# Altium PCB PCB2.PcbDoc (part 1 of 3)
Units mm, origin at the board's own origin, x right, y up, seen from the top; angles counter-clockwise.
Board outline 30 x 45 mm, 4 copper layers (L1 (SIG), L2 (GND), L3 (GND), L4 (SIG+PWR)), stack 0.602 mm thick; 68 components, 50 nets, 259 pads, 113 vias.
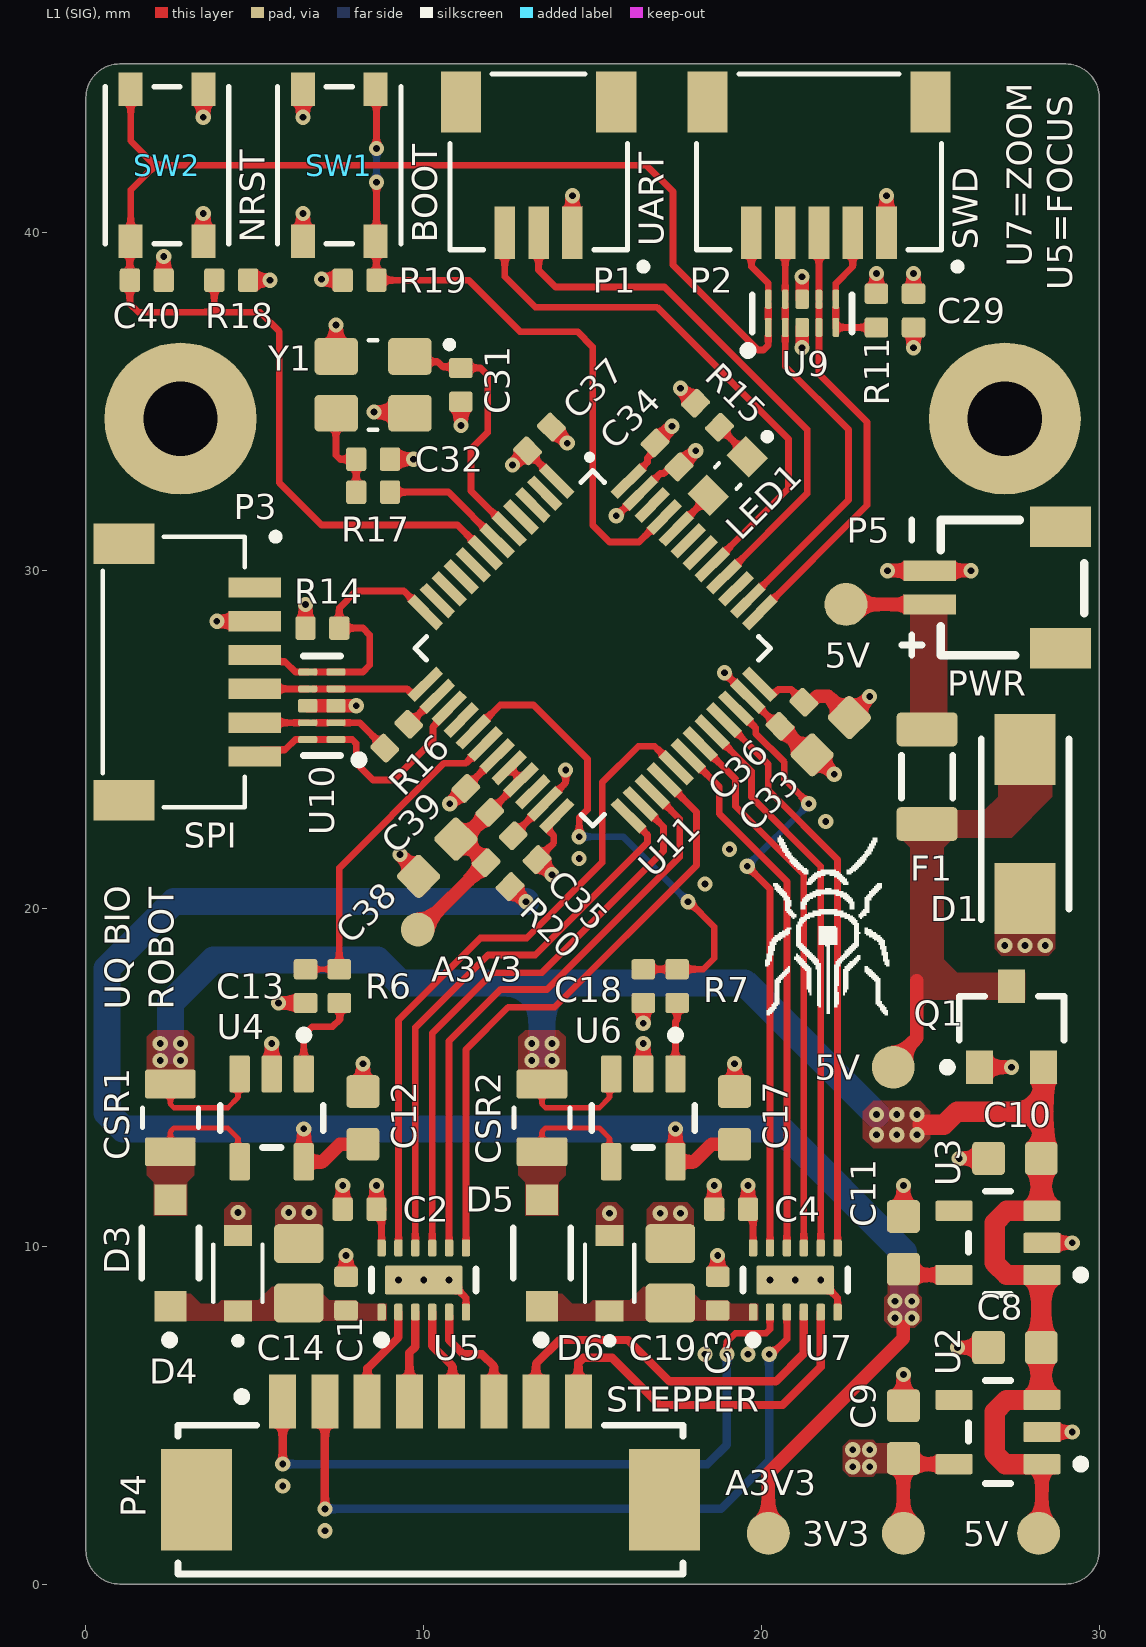
[diagram p0: L1 (SIG) view]
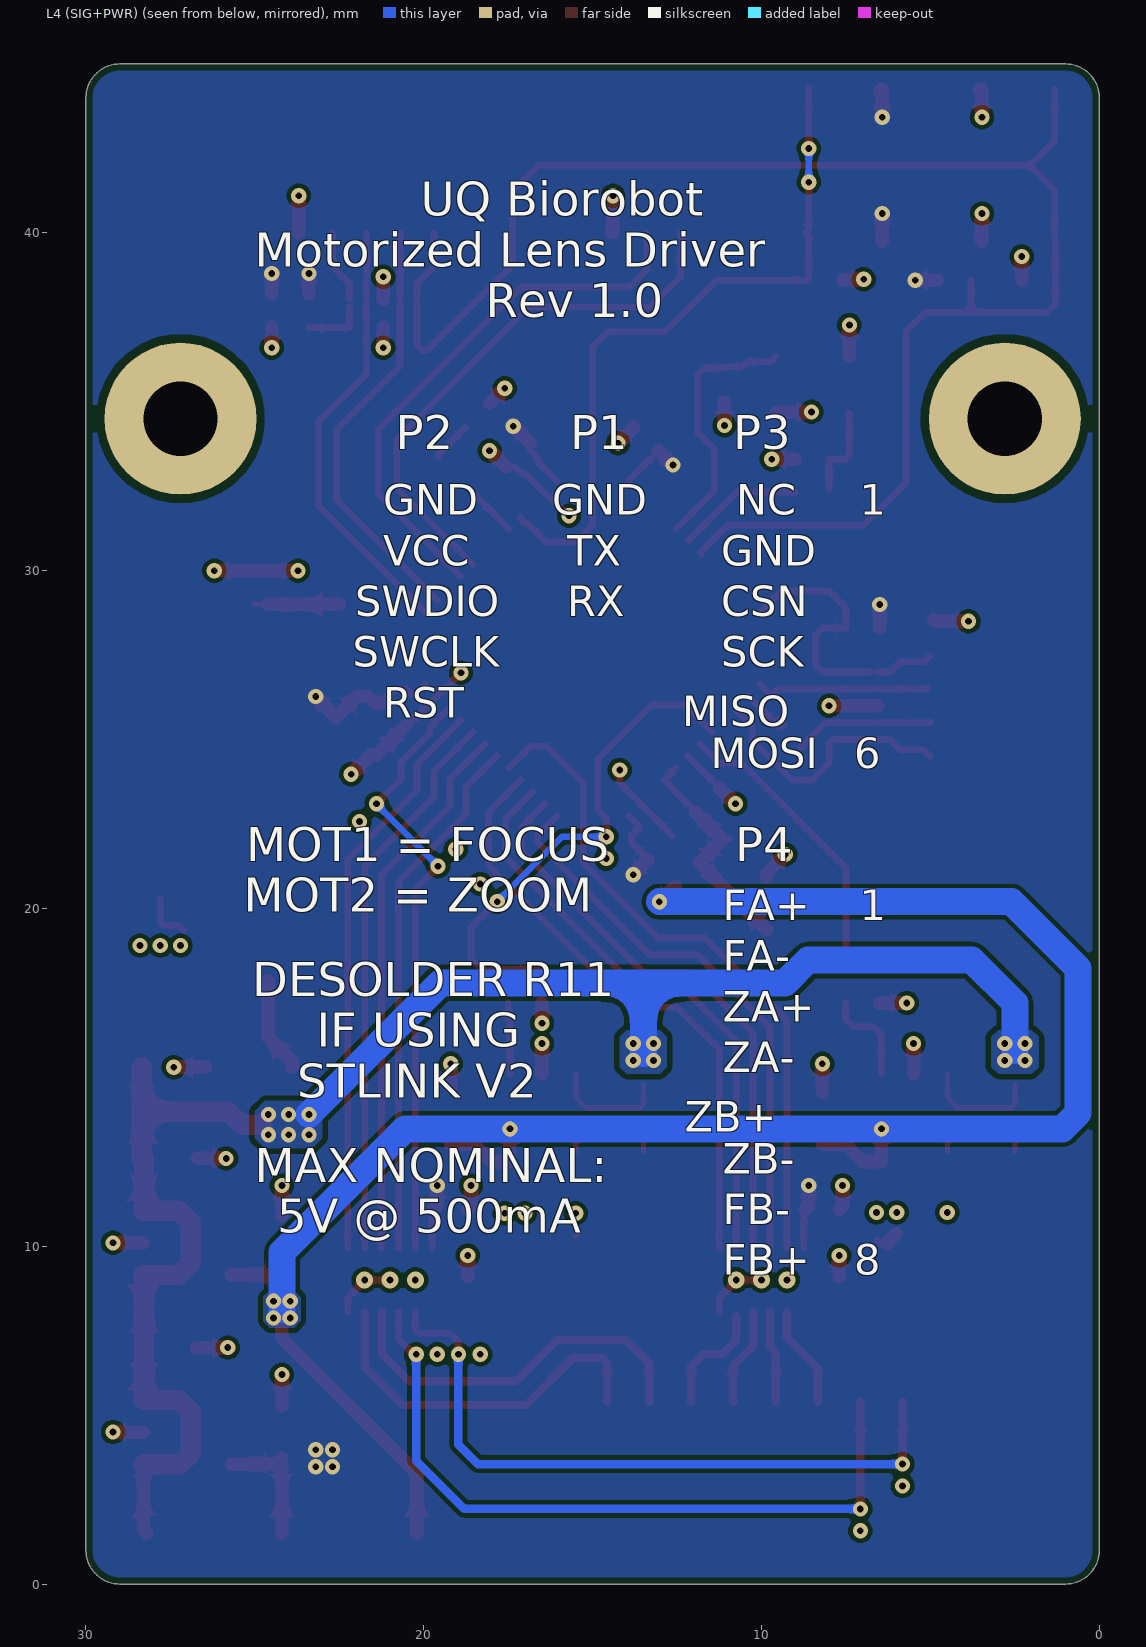
[diagram p1: L4 (SIG+PWR) view, seen from below]
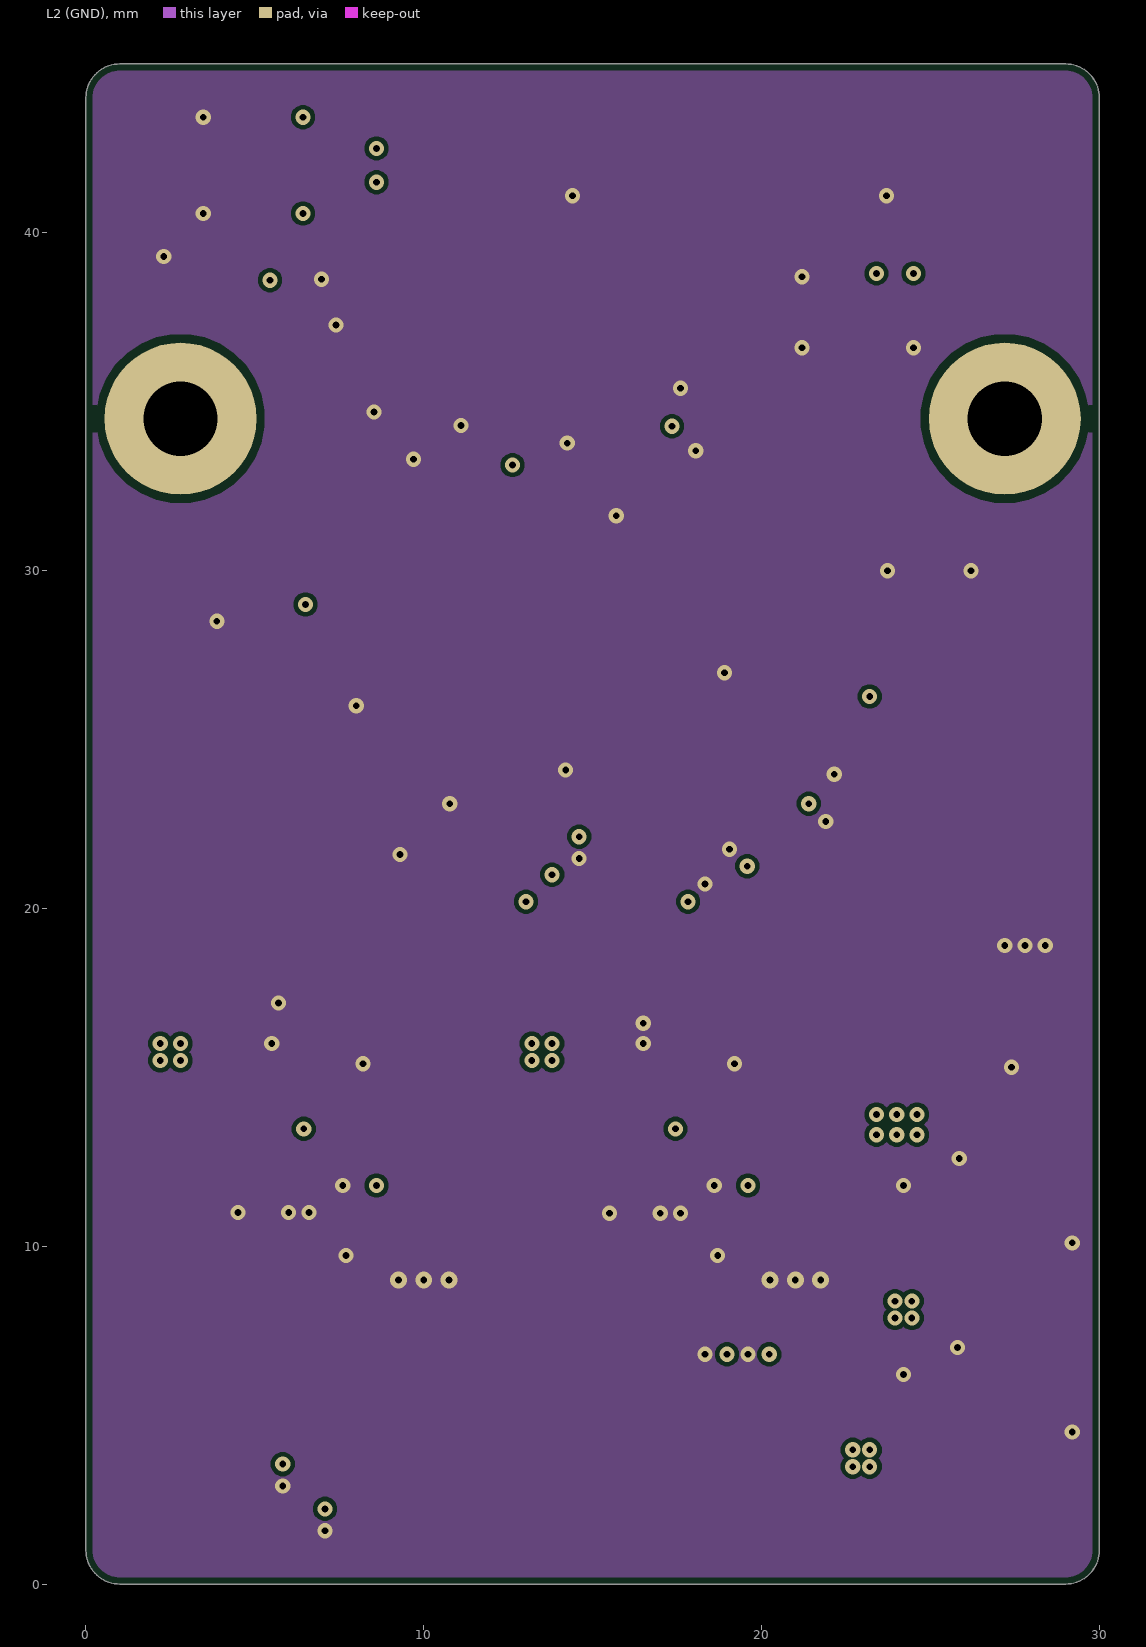
[diagram p2: L2 (GND)]
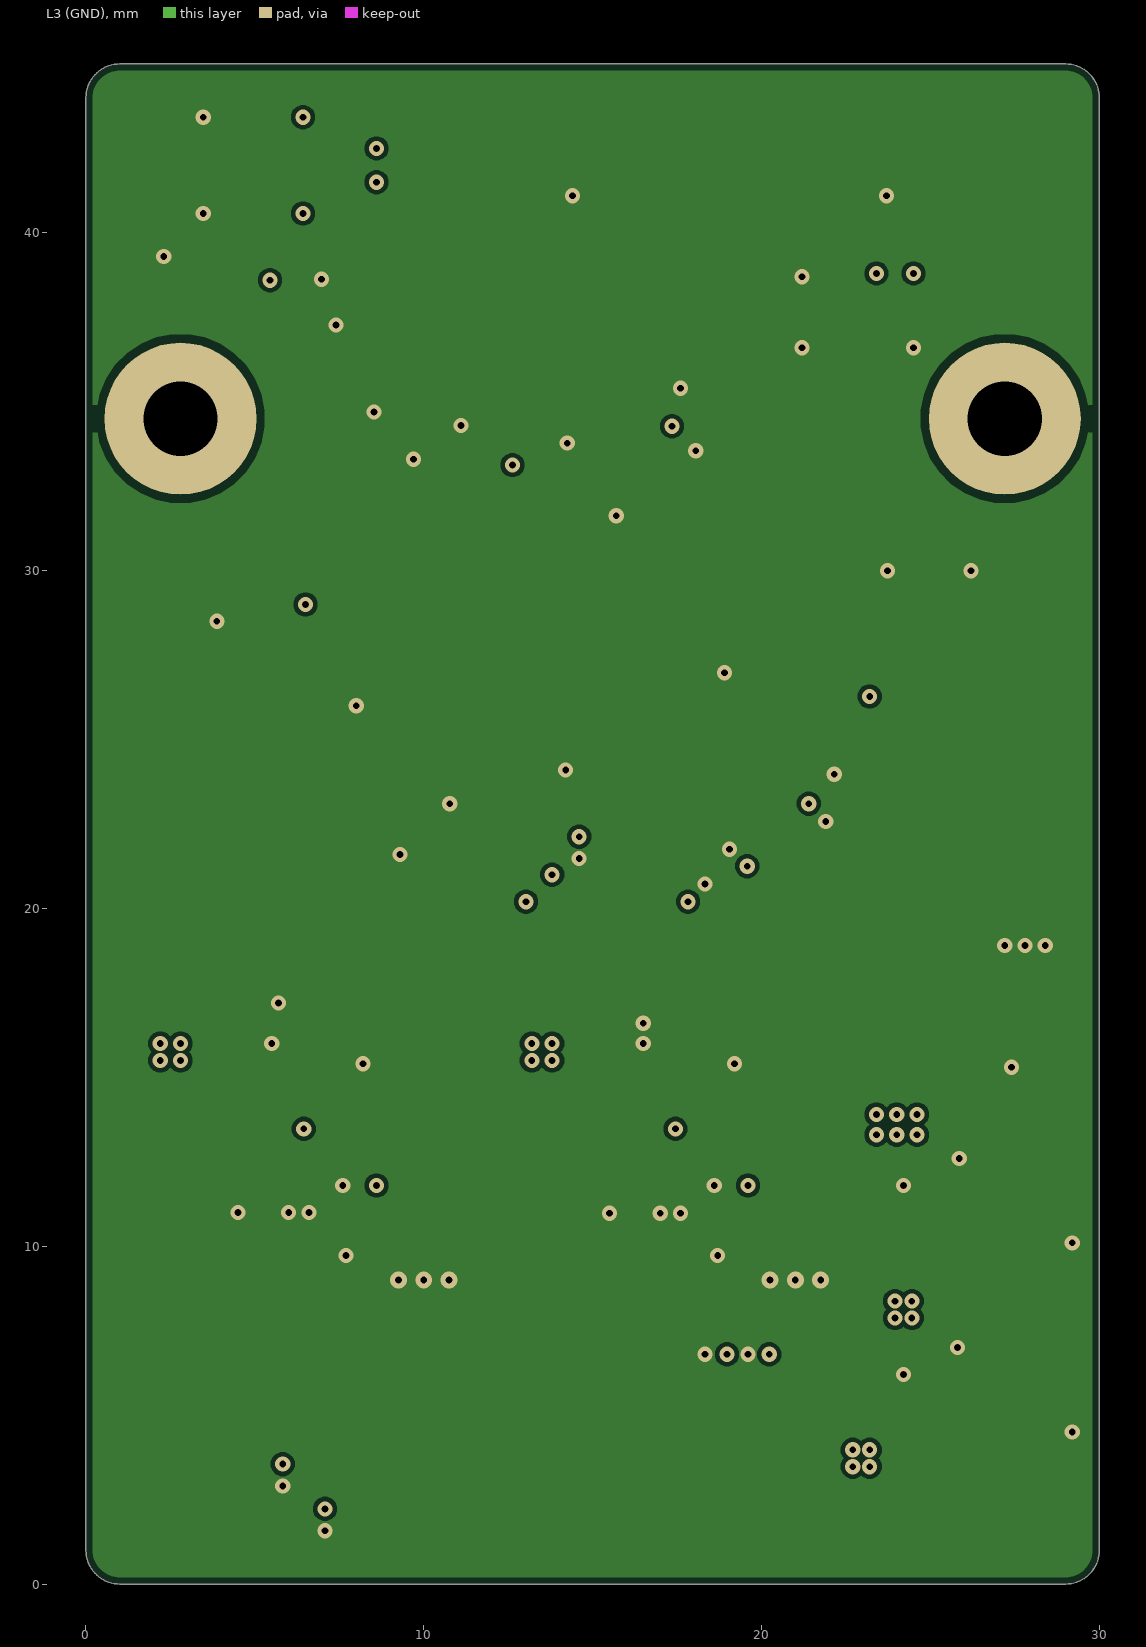
[diagram p3: L3 (GND)]
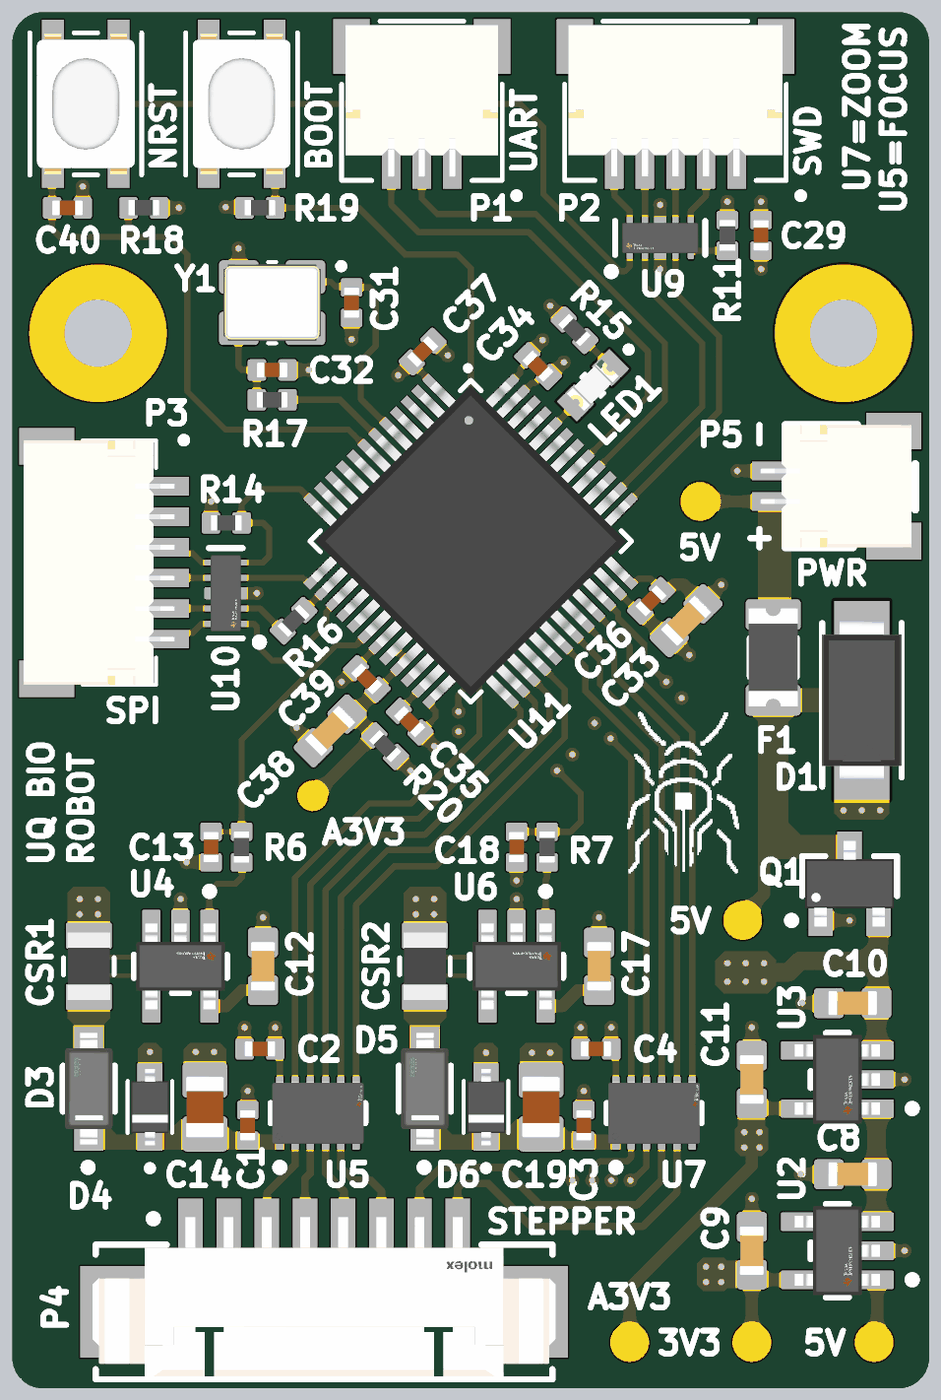
[diagram p4: 3D render of the assembled board from above, using the file's embedded part models]

## Layer stack, top to bottom
Top Solder: solder mask 0.0102, Solder Resist, Dk 3.5
L1 (SIG): signal copper 0.035
Dielectric 2: prepreg 0.0711, PP-006, Dk 4.1
L2 (GND): signal copper 0.035
Dielectric 1: dielectric 0.32, FR-4, Dk 4.8
L3 (GND): signal copper 0.035
Dielectric 3: prepreg 0.0711, PP-006, Dk 4.1
L4 (SIG+PWR): signal copper 0.035
Bottom Solder: solder mask 0.0102, Solder Resist, Dk 3.5

## Board outline
0,44 cw(c1,44) 1,45 29,45 cw(c29,44) 30,44 30,1 cw(c29,1) 29,0 1,0 cw(c1,1) 0,1

## Design rules (kind name [scope] priority, off if disabled: settings)
BoardOutlineClearance [All] p1: gap=0.2 ignorepadtopadclearanceinfootprint=FALSE
Clearance [All] p1: gap=0.127 ignorepadtopadclearanceinfootprint=FALSE except(0.102: Arc-Text Track-Text SMDPad-Text THPad-Text Fill-Text Poly-Text Region-Text Text-Text; 0.12: Arc-Arc Arc-Track Track-Track; 0.15: Arc-SMDPad Arc-Via Track-SMDPad Track-Via SMDPad-SMDPad SMDPad-THPad THPad-THPad Fill-Fill Fill-Poly Fill-Region Poly-Poly Poly-Region Region-Region; 0.2: Arc-THPad Track-THPad; 0.25: Arc-Hole Track-Hole SMDPad-Hole THPad-Fill THPad-Poly THPad-Region THPad-Hole Via-Hole Fill-Hole Poly-Hole Region-Hole Text-Hole)
DiffPairsRouting [InDifferentialPairClass('USBCONN_DIFF')] p1: maxlimit=0.127 minlimit=0.102 mostfreqgap=0.127 toplayer_mingap=0.127 toplayer_minwidth=0.2 toplayer_maxwidth=0.2 toplayer_prefwidth=0.2 midlayer1_minwidth=0.381 midlayer1_maxwidth=0.381 midlayer1_prefwidth=0.381 midlayer2_minwidth=0.381 midlayer2_maxwidth=0.381 midlayer2_prefwidth=0.381 bottomlayer_mingap=0.127 bottomlayer_minwidth=0.2 bottomlayer_maxwidth=0.2 bottomlayer_prefwidth=0.2 impedanceprofiledriven=TRUE maxuncoupledlength=12.7
HoleSize [All] p1: absolutevalues=TRUE maxlimit=6.3 minlimit=0.2 maxpercent=80.000 minpercent=20.000
HoleToHoleClearance [All] p1: gap=0.25 allowstackedmicrovias=FALSE
MinimumAnnularRing [All] p1: minimumring=0.12
MinimumSolderMaskSliver [All] p1: minsoldermaskwidth=0.1
PlaneClearance [All] p1: clearance=0.15
PlaneConnect PlaneConnectPowerPads [InPadClass('PowerPads')] p1: planeconnectstyle=Direct reliefexpansion=0.508 reliefentries=4 reliefconductorwidth=0.254 reliefairgap=0.254
PlaneConnect [All] p2: planeconnectstyle=Direct reliefexpansion=0.3 reliefentries=4 reliefconductorwidth=1 reliefairgap=0.102
PolygonConnect PolygonConnectPowerPads [All vs (InPadClass('PowerPads'))] p1: connectstyle=Direct reliefconductorwidth=0.254 reliefentries=4 polygonreliefangle="90 Angle" airgapwidth=0.254
PolygonConnect [All] p2: connectstyle=Direct reliefconductorwidth=0.5 reliefentries=4 polygonreliefangle="90 Angle" airgapwidth=0.102
RoutingVias [All] p1: holewidth=0.2 width=0.45 viastyle="Through Hole" minholewidth=0.2 minwidth=0.45 maxholewidth=0.2 maxwidth=0.45
SilkToSilkClearance [All] p1: silktosilkclearance=0
SilkToSolderMaskClearance [IsPad] p1: minsilkscreentomaskgap=0.102 clearancetoexposedcopper=TRUE
SolderMaskExpansion SolderMaskExpansion_1 [IsVia] p1: expansion=0.102 istentingtop=TRUE
SolderMaskExpansion [All] p2: expansion=0.075 istentingtop=FALSE
Width [All] p1: maxlimit=0.8 minlimit=0.102 preferedwidth=0.2 toplayer_minwidth=0.15 bottomlayer_minwidth=0.15 minimp=50.000000 maximp=50.000000 favimp=50.000000
22 further rules are at their usual default settings.

## Classes and differential pairs
component class U_StepperPower: 3V3 C8 C9 C10 C11 U2 U3
component class U_Peripherals: 5V C29 D1 F1 P1 P2 P3 P4 Q1 R11 U9 U10
component class U_Motor2: C1 C2 C12 C13 C14 CSR1 D3 D4 R6 U4 U5
component class U_Motor1: C3 C4 C17 C18 C19 CSR2 D5 D6 R7 U6 U7
component class U_MCU: A3V3 C31 C32 C33 C34 C35 C36 C37 C38 C39 C40 LED1 R14 R15 R16 R17 R18 R19 R20 SW1 SW2 U11 Y1

## Components (designator, comment, footprint, x,y, rotation, side; value= is the part's Value field where it differs from the comment)
3V3 "50mil TEST_PAD" 15mil_TEST_PAD 24.2,1.5 r0 top (schematic designator TP4)
5V "50mil TEST_PAD" 15mil_TEST_PAD 28.2,1.5 r0 top (schematic designator TP3)
5V "50mil TEST_PAD" 15mil_TEST_PAD 22.5,29 r0 top (schematic designator TP2)
5V "50mil TEST_PAD" 15mil_TEST_PAD 23.9,15.3 r90 top (schematic designator TP1)
A3V3 "1mm TEST_PAD" 1mm_TEST_PAD 9.825,19.375 r0 top (schematic designator TP8)
A3V3 "50mil TEST_PAD" 15mil_TEST_PAD 20.2,1.5 r0 top (schematic designator TP5)
C1 "100nF" 0402_Cap 7.7,8.6 r270 top
C2 "100nF" 0402_Cap 8.1,11.1 r0 top
C3 "100nF" 0402_Cap 18.7,8.6 r270 top
C4 "100nF" 0402_Cap 19.1,11.1 r0 top
C8 "1uF" 0603_CAP 27.5,7 r0 top
C9 "2.2µF" 0603_CAP 24.2,4.5 r270 top
C10 "1uF" 0603_CAP 27.5,12.6 r0 top
C11 "2.2µF" 0603_CAP 24.2,10.1 r270 top
C12 "100nF" 0603_CAP 8.2,13.8 r270 top
C13 "1nF" 0402_Cap 6.5,17.7 r90 top
C14 "22uF" 0805_CAP 6.3,9.2 r270 top
C17 "100nF" 0603_CAP 19.2,13.8 r270 top
C18 "1nF" 0402_Cap 16.5,17.7 r90 top
C19 "22uF" 0805_CAP 17.3,9.2 r270 top
C29 "100nF" 0402_Cap 24.5,37.7 r90 top
C31 "12pF" 0402_Cap 11.1,35.5 r270 top
C32 "12pF" 0402_Cap 8.5,33.3 r180 top
C33 "10uF" 0603_CAP 22.05,25.1 r45 top
C34 "100nF" 0402_Cap 17.2,33.425 r135 top
C35 "100nF" 0402_Cap 13,21.8 r315 top
C36 "100nF" 0402_Cap 20.9,25.75 r45 top
C37 "100nF" 0402_Cap 13.425,33.9 r225 top
C38 "1uF" 0603_CAP 10.4,21.5 r45 top
C39 "10nF" 0402_Cap 11.6,23.2 r315 top
C40 "100nF" 0402_Cap 1.8,38.6 r180 top
CSR1 "0.5R" 0805_VIS-M 2.5,13.8 r90 top
CSR2 "0.5R" 0805_VIS-M 13.5,13.8 r90 top
D1 "SMAJ5.0CA" DIOM5026X229N 27.8,22.5 r90 top
D3 "1N5819HW-7-F" FP-SOD123-MFG 2.5,9.8 r90 top
D4 "SD05" DIO_MM3Z3V0T1G 4.5,9.2 r90 top
D5 "1N5819HW-7-F" FP-SOD123-MFG 13.5,9.8 r90 top
D6 "SD05" DIO_MM3Z3V0T1G 15.5,9.2 r90 top
F1 "1.5A Trip" 1206_PTC 24.9,23.9 r270 top
LED1 "GREEN" 0603_LED 19,32.8 r225 top
P1 "SM03B-SRSS-TB" SM03B-SRSS-TB 13.4,42.1 r180 top
P2 "SM05B-SRSS-TB" SM05B-SRSS-TB 21.7,42.1 r180 top
P3 "SM06B-SRSS-TB" SM06B-SRSS-TB 3,27 r270 top
P4 "53261-0871" FP-532610871-MFG 10.2,2.5 r180 top
P5 "SM02B-SRSS-TB" SM02B-SRSS-TB 26.95,29.5 r90 top
Q1 "AO3401A" AO-SOT-23-3L_V 27.4,16.5 r90 top
R6 "1K" 0402_RES 7.5,17.7 r90 top
R7 "1K" 0402_RES 17.5,17.7 r90 top
R11 "0R" 0402_RES 23.4,37.7 r270 top
R14 "10K" 0402_RES 7,28.3 r0 top
R15 "300R" 0402_RES 18.4,34.6 r315 top
R16 "0R" 0402_RES 9.2,25.1 r45 top
R17 "0R" 0402_RES 8.5,32.325 r0 top
R18 "10K" 0402_RES 4.3,38.6 r0 top
R19 "10K" 0402_RES 8.1,38.6 r0 top
R20 "0R" 0402_RES 12.2,21 r135 top
SW1 "SPST N.O. Button" "SW4_PTS815 SJM 250 SMTR LFS_CNK" 7.5,42 r90 top
SW2 "SPST N.O. Button" "SW4_PTS815 SJM 250 SMTR LFS_CNK" 2.4,42 r90 top
U2 "TPS7A2033PDBVR" FP-DBV0005A-MFG 27,4.5 r180 top
U3 "TPS7A2033PDBVR" FP-DBV0005A-MFG 27,10.1 r180 top
U4 "INA180A1IDBVR" FP-DBV0005A-MFG 5.5,13.8 r270 top
U5 "DRV8835DSSR" FP-DSS0012A-MFG 10,9 r90 top
U6 "INA180A1IDBVR" FP-DBV0005A-MFG 16.5,13.8 r270 top
U7 "DRV8835DSSR" FP-DSS0012A-MFG 21,9 r90 top
U9 "TPD4E02B04DQAR" FP-DQA0010A-MFG 21.2,37.617 r90 top
U10 "TPD4E02B04DQAR" FP-DQA0010A-MFG 6.982,26 r180 top
U11 "STM32G431C6T6" LQFP48-7x7mm 15,27.7 r315 top
Y1 "24MHz 9pF" OSCCC320X250X60 8.5,35.5 r180 top

## Footprints (in the part's own frame and the unit in brackets; to place one, negate y for a bottom-side part, rotate by r counter-clockwise, add the part's x,y. Pads: shape width x height; smd on the part's side, far side on the other; paste and mask are expansions set on the pad)
1mm_TEST_PAD [mm]
  round 1 smd paste-2539.97 mask+0.051: 1(0,0)
15mil_TEST_PAD [mm]
  round 1.27 smd paste-2539.97 mask+0.051: 1(0,0)
0402_Cap [mm]
  rrect25% 0.6x0.7 smd paste+0 mask+0.051: 1(-0.5,0) 2(0.5,0)
  body extent -0.5,-0.25 0.5,0.25, height 0.55
0402_RES [mm]
  rrect25% 0.6x0.7 smd paste+0 mask+0.051: 1(-0.5,0) 2(0.5,0)
  body extent -0.5,-0.25 0.5,0.25, height 0.4
0603_CAP [mm]
  rrect25% 0.972x0.981 smd mask+0.051: 1(-0.78,0) 2(0.78,0)
  body extent -0.8,-0.4 0.8,0.4, height 0.9
0603_LED [mm]
  rect 0.81x0.93 smd: A(0.81,0) C(-0.81,0)
  silkscreen extent -1.75,-0.45 0.09,0.45, body extent -0.8,-0.4 0.8,0.4, height 0.65
0805_CAP [mm]
  rrect25% 1.15x1.47 smd mask+0.051: 1(-0.88,0) 2(0.88,0)
  body extent -1,-0.63 1,0.63, height 1.45
0805_VIS-M [mm]
  rrect15% 0.85x1.5 smd paste+0 mask+0.051: 1(-1.002,0) 2(1.002,0)
  silkscreen extent -0.28,-0.83 0.28,0.83, body extent -1.1,-0.7 1.1,0.7, height 0.84
1206_PTC [mm]
  rrect25% 1x1.8 smd mask+0.051: 1(-1.4,0) 2(1.4,0)
  silkscreen extent -0.64,-0.76 0.64,0.76, body extent -1.6,-0.8 1.6,0.8, height 0.75
AO-SOT-23-3L_V [mm] "SOT23, 3-Leads, Body 3.1x1.8mm, Pitch 0.95mm"
  rect 1x0.8 smd mask+0.051: D(1.2,0) G(-1.2,0.95) S(-1.2,-0.95)
  silkscreen extent -1.32,-1.55 0.9,2.02, body extent -1.4,-1.45 1.4,1.45, height 1.25
DIO_MM3Z3V0T1G [mm]
  rect 0.625x0.83 smd mask+0.051: A(1.112,0) K(-1.112,0)
  silkscreen extent -2.1,-0.73 0.85,0.73, body extent -1.25,-0.62 1.25,0.62, height 1
DIOM5026X229N [mm]
  rect 2.1x1.8 smd paste+0 mask+0.102: 1(-2.2,0) 2(2.2,0)
  silkscreen extent -2.83,-1.3 2.52,1.3, body extent -2.61,-1.3 2.61,1.3, height 2.4
FP-532610871-MFG [mm]
  rect 0.8x1.6 smd paste+0 mask+0.051: 1(4.375,-2.9) 2(3.125,-2.9) 3(1.875,-2.9) 4(0.625,-2.9) 5(-0.625,-2.9) 6(-1.875,-2.9) 7(-3.125,-2.9) 8(-4.375,-2.9)
  rect 2.1x3 smd paste+0 mask+0.051: 9(-6.925,0) 10(6.925,0)
  silkscreen extent -7.47,-3.17 7.47,2.2, body extent -8.08,-3.8 8.08,2.3, height 0.25
FP-DBV0005A-MFG [mm]
  rrect17% 1.1x0.6 smd paste+0 mask+0.051: 1(-1.3,0.95) 2(-1.3,0) 3(-1.3,-0.95) 4(1.3,-0.95) 5(1.3,0.95)
  silkscreen extent -2.58,-1.53 0.87,1.53, body extent -1.95,-1.78 1.95,1.78, height 0.25
FP-DQA0010A-MFG [mm]
  rrect50% 0.565x0.2 smd paste+0 mask+0.051: 1(-0.417,1) 2(-0.417,0.5) 4(-0.417,-0.5) 5(-0.417,-1) 6(0.417,-1) 7(0.417,-0.5) 9(0.417,0.5) 10(0.417,1)
  rrect25% 0.565x0.4 smd paste+0 mask+0.025: 3(-0.417,0) 8(0.417,0)
  silkscreen extent -1.22,-1.48 0.55,1.72, body extent -0.8,-1.4 0.8,1.4, height 0.25
FP-DSS0012A-MFG [mm]
  rrect40% 0.5x0.25 smd paste+0 mask+0.051: 1(-0.95,1.25) 2(-0.95,0.75) 3(-0.95,0.25) 4(-0.95,-0.25) 5(-0.95,-0.75) 6(-0.95,-1.25) 7(0.95,-1.25) 8(0.95,-0.75) 9(0.95,-0.25) 10(0.95,0.25) 11(0.95,0.75) 12(0.95,1.25)
  rrect11% 0.85x2.3 smd paste-0.1 mask+0.051: 13(0,0)
  silkscreen extent -1.9,-1.55 0.33,1.55, body extent -1.3,-1.65 1.3,1.65, height 0.25
FP-SOD123-MFG [mm]
  rect 0.9x0.95 smd paste+0 mask+0.051: A(1.575,0) C(-1.575,0)
  silkscreen extent -2.7,-0.85 0.75,0.85, body extent -2.13,-0.95 2.13,0.95, height 0.25
LQFP48-7x7mm [mil]
  rect 47x12 smd paste+0 mask+1: 1(-167.32,108.27) 2(-167.32,88.58) 3(-167.32,68.9) 4(-167.32,49.21) 5(-167.32,29.53) 6(-167.32,9.84) 7(-167.32,-9.84) 8(-167.32,-29.53) 9(-167.32,-49.21) 10(-167.32,-68.9) 11(-167.32,-88.58) 12(-167.32,-108.27) 25(167.32,-108.27) 26(167.32,-88.58) 27(167.32,-68.9) 28(167.32,-49.21) 29(167.32,-29.53) 30(167.32,-9.84) 31(167.32,9.84) 32(167.32,29.53) 33(167.32,49.21) 34(167.32,68.9) 35(167.32,88.58) 36(167.32,108.27)
  rect 12x47 smd paste+0 mask+1: 13(-108.27,-167.32) 14(-88.58,-167.32) 15(-68.9,-167.32) 16(-49.21,-167.32) 17(-29.53,-167.32) 18(-9.84,-167.32) 19(9.84,-167.32) 20(29.53,-167.32) 21(49.21,-167.32) 22(68.9,-167.32) 23(88.58,-167.32) 24(108.27,-167.32) 37(108.27,167.32) 38(88.58,167.32) 39(68.9,167.32) 40(49.21,167.32) 41(29.53,167.32) 42(9.84,167.32) 43(-9.84,167.32) 44(-29.53,167.32) 45(-49.21,167.32) 46(-68.9,167.32) 47(-88.58,167.32) 48(-108.27,167.32)
  silkscreen extent -163,-147 147,158, body extent -177,-177 177,177, height 63
OSCCC320X250X60 [mm]
  rrect25% 1.29x1.09 smd mask+0.051: 1(-1.09,-0.84) 2(1.09,-0.84) 3(1.09,0.84) 4(-1.09,0.84)
  silkscreen extent -2.36,-1.33 0.13,1.33, body extent -1.6,-1.25 1.6,1.25, height 0.6
SM02B-SRSS-TB [mm]
  rect 0.6x1.55 smd paste+0 mask+0.051: 1(0.5,1.975) 2(-0.5,1.975)
  rect 1.2x1.8 smd paste+0 mask+0.051: P-MOUNT1(-1.8,-1.9) P-MOUNT2(1.8,-1.9)
  silkscreen extent -2,-2.6 2,2.8, body extent -2,-2.48 2,2.48, height 2.95
SM03B-SRSS-TB [mil]
  rect 24x61 smd paste+0 mask+2: 1(-39.37,82.68) 2(0,82.68) 3(39.37,82.68)
  rect 47x71 smd mask+2: P-MOUNT1(-90.55,-69.88) P-MOUNT2(90.55,-69.88)
  silkscreen extent -125,-102 103,125, body extent -98,-97 98,98, height 116
SM05B-SRSS-TB [mil]
  rect 24x61 smd paste+0 mask+2: 1(-78.74,82.68) 2(-39.37,82.68) 3(0,82.68) 4(39.37,82.68) 5(78.74,82.68)
  rect 47x71 smd mask+2: P-MOUNT1(-129.92,-69.88) P-MOUNT2(129.92,-69.88)
  silkscreen extent -165,-102 143,125, body extent -138,-97 138,97, height 116
SM06B-SRSS-TB [mm]
  rect 0.6x1.55 smd mask+0.051: 1(-2.5,2) 2(-1.5,2) 3(-0.5,2) 4(0.5,2) 5(1.5,2) 6(2.5,2)
  rect 1.2x1.8 smd mask+0.051: P-MOUNT1(-3.8,-1.875) P-MOUNT2(3.8,-1.875)
  silkscreen extent -4.08,-2.5 4,2.69, body extent -4,-2.63 4,2.32, height 2.95
"SW4_PTS815 SJM 250 SMTR LFS_CNK" [mm]
  rect 0.991x0.711 smd paste+0 mask+0.051: 1(-2.25,1.075) 2(2.25,1.075) 3(-2.25,-1.075) 4(2.25,-1.075)
  silkscreen extent -2.32,-1.83 2.32,1.83, body extent -2.3,-1.6 2.3,1.6, height 2.7

## Part data
C1 C2 C3 C4 C29 C34 C35 C36 C37 C40: library part GCM155R71H104KE02J, "50V 100nF X7R ±10% 0402 Multilayer Ceramic Capacitors MLCC - SMD/SMT ROHS", Case Code (Imperial)=0402, Case Code (Metric)=1005, Dielectric=X7R, Dielectric Material=Ceramic, Manufacturer=Murata, Manufacturer Lifecycle Status="IN PRODUCTION", Max Operating Temperature=125°C, Min Operating Temperature=-55°C, Ratings=AEC-Q200, Supplier Part Number 1=490-14514-6-ND, Tolerance=±10%, Voltage Rating=50V, Capacitance=100nF, Case/Package=0402, Category="Ceramic Capacitors", ComponentLink1Description=https://datasheet.octopart.com:443/GCM155R71H104KE02J-Murata-datasheet-155345015.pdf?src-supplier=Newark, ComponentLink1URL=https://datasheet.octopart.com:443/GCM155R71H104KE02J-Murata-datasheet-155345015.pdf?src-supplier=Newark, ComponentLink2Description=https://datasheet.octopart.com:443/GCM155R71H104KE02J-Murata-datasheet-178519985.pdf?src-supplier=Arrow.cn, ComponentLink2URL=https://datasheet.octopart.com:443/GCM155R71H104KE02J-Murata-datasheet-178519985.pdf?src-supplier=Arrow.cn, ComponentLink3Description=https://datasheet.octopart.com:443/GCM155R71H104KE02J-Murata-datasheet-141266224.pdf?src-supplier=Ciiva, ComponentLink3URL=https://datasheet.octopart.com:443/GCM155R71H104KE02J-Murata-datasheet-141266224.pdf?src-supplier=Ciiva, ComponentLink4Description=https://datasheet.octopart.com:443/GCM155R71H104KE02J-Murata-datasheet-140656751.pdf?src-supplier=Ciiva, ComponentLink4URL=https://datasheet.octopart.com:443/GCM155R71H104KE02J-Murata-datasheet-140656751.pdf?src-supplier=Ciiva, ComponentLink5Description=https://datasheet.octopart.com:443/GCM155R71H104KE02J-Murata-datasheet-138716456.pdf?src-supplier=Ciiva, ComponentLink5URL=https://datasheet.octopart.com:443/GCM155R71H104KE02J-Murata-datasheet-138716456.pdf?src-supplier=Ciiva, ComponentLink6Description=https://datasheet.octopart.com:443/GCM155R71H104KE02J-Murata-datasheet-77992203.pdf?src-supplier=Future+Electronics, ComponentLink6URL=https://datasheet.octopart.com:443/GCM155R71H104KE02J-Murata-datasheet-77992203.pdf?src-supplier=Future+Electronics, ComponentLink7Description=https://datasheet.octopart.com:443/GCM155R71H104KE02J-Murata-datasheet-12511495.pdf?src-supplier=TME, ComponentLink7URL=https://datasheet.octopart.com:443/GCM155R71H104KE02J-Murata-datasheet-12511495.pdf?src-supplier=TME, ComponentLink8Description=http://sigma.octopart.com:80/reach_statement/Murata-company-16.pdf?src-supplier=Compliance+Statements, ComponentLink8URL=http://sigma.octopart.com:80/reach_statement/Murata-company-16.pdf?src-supplier=Compliance+Statements, Country of Origin=Philippines, Export Control Classification Number (ECCN) Code=EAR99, Harmonized Tariff Schedule (HTS) Code=8532.24.00.20, Height=500µm, Introduction Date=2013-11-20, Length=1mm, Lifecycle Status=Production, Manufacturer Part Number=GCM155R71H104KE02J, Material=Ceramic, Mount="Surface Mount", Number of Terminals=2, Packaging="Tape & Reel (TR)", Pricing 1="1=0.1, 10=0.034, 50=0.0226, 100=0.0193, 500=0.01374, 1000=0.01205, 2500=0.01027, 5000=0.0092 (USD)", REACH SVHC=Yes, RoHS=Compliant, Schedule B="8532240020, 8532240020|8532240020, 8532240020|8532240020|8532240020, 8532240020|8532240020|8532240020|8532240020", Stock 1=13930662, Supplier 1=DigiKey, Termination=SMD/SMT, Voltage Rating (DC)=50V, Weight=6.010099mg, Width=500µm
C8 C10 C38: library part GCM188R71E105KA64D, "25V 1uF X7R ±10% 0603 Multilayer Ceramic Capacitors MLCC - SMD/SMT ROHS", Capacitance=1µF, Case Code (Imperial)=0603, Case Code (Metric)=1608, Dielectric=X7R, Dielectric Material=Ceramic, Manufacturer=Murata, Manufacturer Lifecycle Status="IN PRODUCTION", Max Operating Temperature=125°C, Min Operating Temperature=-55°C, Ratings=AEC-Q200, Supplier Part Number 1=490-10673-1-ND, Tolerance=±10%, Voltage=25V, Case/Package=0603, Category="Ceramic Capacitors", ComponentLink1Description=https://datasheet.octopart.com:443/GCM188R71E105KA64D-Murata-datasheet-39128443.pdf?src-supplier=Newark, ComponentLink1URL=https://datasheet.octopart.com:443/GCM188R71E105KA64D-Murata-datasheet-39128443.pdf?src-supplier=Newark, ComponentLink2Description=https://datasheet.octopart.com:443/GCM188R71E105KA64D-Murata-datasheet-62316951.pdf?src-supplier=element14+APAC, ComponentLink2URL=https://datasheet.octopart.com:443/GCM188R71E105KA64D-Murata-datasheet-62316951.pdf?src-supplier=element14+APAC, ComponentLink3Description=https://datasheet.octopart.com:443/GCM188R71E105KA64D-Murata-datasheet-141267554.pdf?src-supplier=Geoflip, ComponentLink3URL=https://datasheet.octopart.com:443/GCM188R71E105KA64D-Murata-datasheet-141267554.pdf?src-supplier=Geoflip, ComponentLink4Description=https://datasheet.octopart.com:443/GCM188R71E105KA64D-Murata-datasheet-140658666.pdf?src-supplier=Ciiva, ComponentLink4URL=https://datasheet.octopart.com:443/GCM188R71E105KA64D-Murata-datasheet-140658666.pdf?src-supplier=Ciiva, ComponentLink5Description=https://datasheet.octopart.com:443/GCM188R71E105KA64D-Murata-datasheet-138718232.pdf?src-supplier=Ciiva, ComponentLink5URL=https://datasheet.octopart.com:443/GCM188R71E105KA64D-Murata-datasheet-138718232.pdf?src-supplier=Ciiva, ComponentLink6Description=https://datasheet.octopart.com:443/GCM188R71E105KA64D-Murata-datasheet-81455541.pdf?src-supplier=TME, ComponentLink6URL=https://datasheet.octopart.com:443/GCM188R71E105KA64D-Murata-datasheet-81455541.pdf?src-supplier=TME, ComponentLink7Description=https://datasheet.octopart.com/GCM188R71E105KA64D-Murata-datasheet-14404430.pdf, ComponentLink7URL=https://datasheet.octopart.com/GCM188R71E105KA64D-Murata-datasheet-14404430.pdf, ComponentLink8Description=https://datasheet.octopart.com:443/GCM188R71E105KA64D-Murata-datasheet-14393380.pdf?src-supplier=Future+Electronics, ComponentLink8URL=https://datasheet.octopart.com:443/GCM188R71E105KA64D-Murata-datasheet-14393380.pdf?src-supplier=Future+Electronics, ComponentLink9Description=https://datasheet.octopart.com:443/GCM188R71E105KA64D-Murata-datasheet-44103482.pdf?src-supplier=Future+Electronics, ComponentLink9URL=https://datasheet.octopart.com:443/GCM188R71E105KA64D-Murata-datasheet-44103482.pdf?src-supplier=Future+Electronics, ComponentLink10Description=http://sigma.octopart.com:80/reach_statement/Murata-company-16.pdf?src-supplier=Compliance+Statements, ComponentLink10URL=http://sigma.octopart.com:80/reach_statement/Murata-company-16.pdf?src-supplier=Compliance+Statements, Country of Origin=Philippines, Depth=800µm, Export Control Classification Number (ECCN) Code=EAR99, Harmonized Tariff Schedule (HTS) Code=8532.24.00.20, Height=800µm, Introduction Date=2010-10-29, Lead Free="Lead Free", Length=1.6mm, Lifecycle Status=Production, Manufacturer Part Number=GCM188R71E105KA64D, Material=Ceramic, Mount="Surface Mount", Number of Terminals=2, Packaging="Cut Tape", Pricing 1="1=0.19, 10=0.106, 50=0.0752, 100=0.0658, 500=0.04994, 1000=0.04504 (USD)", Radiation Hardening=No, REACH SVHC=Yes, RoHS=Compliant, Schedule B="8532240020, 8532240020|8532240020, 8532240020|8532240020|8532240020, 8532240020|8532240020|8532240020|8532240020", Stock 1=751115, Supplier 1=DigiKey, Termination=SMD/SMT, Voltage Rating=25V, Voltage Rating (DC)=25V, Weight=6.293594mg, Width=800µm
C9 C11: library part GRM188Z71E225KE43D, "25V 2.2uF X7R ±10% 0603 Multilayer Ceramic Capacitors MLCC - SMD/SMT ROHS", Case/Package=0603, Dielectric Material=X7R, Manufacturer=Murata, Manufacturer Lifecycle Status="IN PRODUCTION", Max Operating Temperature=125°C, Min Operating Temperature=-55°C, Supplier Part Number 1=490-GRM188Z71E225KE43DCT-ND, Tolerance=±10%, Voltage Rating=25V, Capacitance=2.2µF, Category="Ceramic Capacitors", ComponentLink1Description=https://datasheet.octopart.com:443/GRM188Z71E225KE43D-Murata-datasheet-141276026.pdf?src-supplier=Geoflip, ComponentLink1URL=https://datasheet.octopart.com:443/GRM188Z71E225KE43D-Murata-datasheet-141276026.pdf?src-supplier=Geoflip, ComponentLink2Description=https://datasheet.octopart.com:443/GRM188Z71E225KE43D-Murata-datasheet-165579666.pdf?src-supplier=TME, ComponentLink2URL=https://datasheet.octopart.com:443/GRM188Z71E225KE43D-Murata-datasheet-165579666.pdf?src-supplier=TME, ComponentLink3Description=https://datasheet.octopart.com:443/GRM188Z71E225KE43D-Murata-datasheet-140705919.pdf?src-supplier=Ciiva, ComponentLink3URL=https://datasheet.octopart.com:443/GRM188Z71E225KE43D-Murata-datasheet-140705919.pdf?src-supplier=Ciiva, ComponentLink4Description=https://datasheet.octopart.com:443/GRM188Z71E225KE43D-Murata-datasheet-138743437.pdf?src-supplier=Ciiva, ComponentLink4URL=https://datasheet.octopart.com:443/GRM188Z71E225KE43D-Murata-datasheet-138743437.pdf?src-supplier=Ciiva, ComponentLink5Description=http://sigma.octopart.com:80/reach_statement/Murata-company-16.pdf?src-supplier=Compliance+Statements, ComponentLink5URL=http://sigma.octopart.com:80/reach_statement/Murata-company-16.pdf?src-supplier=Compliance+Statements, Export Control Classification Number (ECCN) Code=EAR99, Harmonized Tariff Schedule (HTS) Code=8532.24.00.20, Height=800µm, Introduction Date=2017-02-21, Length=1.6mm, Lifecycle Status=Production, Manufacturer Part Number=GRM188Z71E225KE43D, Material=Ceramic, Mount="Surface Mount", Number of Terminals=2, Pricing 1="1=0.17, 10=0.096, 50=0.068, 100=0.0593, 500=0.04474, 1000=0.04026 (USD)", REACH SVHC=Yes, RoHS=Compliant, Stock 1=149124, Supplier 1=DigiKey, Thickness=800µm, Voltage Rating (DC)=25V, Width=800µm
C12 C17: library part GCJ188R71H104KA12D, "50V 100nF X7R ±10% 0603 Multilayer Ceramic Capacitors MLCC - SMD/SMT ROHS", Case Code (Imperial)=0603, Case Code (Metric)=1608, Dielectric=X7R, Dielectric Material=Ceramic, Manufacturer=Murata, Manufacturer Lifecycle Status="IN PRODUCTION", Max Operating Temperature=125°C, Min Operating Temperature=-55°C, Ratings=AEC-Q200, Supplier Part Number 1=490-5798-1-ND, Tolerance=±10%, Voltage Rating=50V, Capacitance=100nF, Case/Package=0603, Category="Ceramic Capacitors", ComponentLink1Description=https://datasheet.octopart.com:443/GCJ188R71H104KA12D-Murata-datasheet-68586835.pdf?src-supplier=Newark, ComponentLink1URL=https://datasheet.octopart.com:443/GCJ188R71H104KA12D-Murata-datasheet-68586835.pdf?src-supplier=Newark, ComponentLink2Description=https://datasheet.octopart.com:443/GCJ188R71H104KA12D-Murata-datasheet-140654765.pdf?src-supplier=Ciiva, ComponentLink2URL=https://datasheet.octopart.com:443/GCJ188R71H104KA12D-Murata-datasheet-140654765.pdf?src-supplier=Ciiva, ComponentLink3Description=https://datasheet.octopart.com:443/GCJ188R71H104KA12D-Murata-datasheet-138714437.pdf?src-supplier=Ciiva, ComponentLink3URL=https://datasheet.octopart.com:443/GCJ188R71H104KA12D-Murata-datasheet-138714437.pdf?src-supplier=Ciiva, ComponentLink4Description=https://datasheet.octopart.com:443/GCJ188R71H104KA12D-Murata-datasheet-165611796.pdf?src-supplier=TME, ComponentLink4URL=https://datasheet.octopart.com:443/GCJ188R71H104KA12D-Murata-datasheet-165611796.pdf?src-supplier=TME, ComponentLink5Description=https://datasheet.octopart.com:443/GCJ188R71H104KA12D-Murata-datasheet-12524712.pdf?src-supplier=Future+Electronics, ComponentLink5URL=https://datasheet.octopart.com:443/GCJ188R71H104KA12D-Murata-datasheet-12524712.pdf?src-supplier=Future+Electronics, ComponentLink6Description=https://datasheet.octopart.com/GCJ188R71H104KA12D-Murata-datasheet-14405607.pdf, ComponentLink6URL=https://datasheet.octopart.com/GCJ188R71H104KA12D-Murata-datasheet-14405607.pdf, ComponentLink7Description=http://sigma.octopart.com:80/reach_statement/Murata-company-16.pdf?src-supplier=Compliance+Statements, ComponentLink7URL=http://sigma.octopart.com:80/reach_statement/Murata-company-16.pdf?src-supplier=Compliance+Statements, Country of Origin="Japan, Philippines", Depth=800µm, Export Control Classification Number (ECCN) Code=EAR99, Features="Soft Termination", Harmonized Tariff Schedule (HTS) Code=8532.24.00.20, Height=800µm, Introduction Date=2012-05-07, Lead Free="Lead Free", Length=1.6mm, Lifecycle Status=Production, Manufacturer Part Number=GCJ188R71H104KA12D, Material=Ceramic, Mount="Surface Mount", Number of Terminals=2, Packaging="Cut Tape", Pricing 1="1=0.13, 10=0.073, 50=0.0508, 100=0.044, 500=0.0327, 1000=0.02922 (USD)", Radiation Hardening=No, REACH SVHC=Yes, RoHS=Compliant, Schedule B="8532240020, 8532240020|8532240020, 8532240020|8532240020|8532240020, 8532240020|8532240020|8532240020|8532240020", Stock 1=938408, Supplier 1=DigiKey, Termination=SMD/SMT, Voltage Rating (DC)=50V, Width=800µm
C13 C18: library part GCM1555C1H102FA16D, "50V 1nF C0G ±1% 0402 Multilayer Ceramic Capacitors MLCC - SMD/SMT ROHS", Case/Package=0402, Dielectric=C0G, Dielectric Material=Ceramic, Manufacturer=Murata, Manufacturer Lifecycle Status="IN PRODUCTION", Max Operating Temperature=125°C, Min Operating Temperature=-55°C, Ratings=AEC-Q200, Supplier Part Number 1=490-16461-1-ND, Temperature Coefficient=30ppm/°C, Tolerance=±1%, Voltage Rating=50V, Capacitance=1nF, Category="Ceramic Capacitors", ComponentLink1Description=https://datasheet.octopart.com:443/GCM1555C1H102FA16D-Murata-datasheet-149522306.pdf?src-supplier=Newark, ComponentLink1URL=https://datasheet.octopart.com:443/GCM1555C1H102FA16D-Murata-datasheet-149522306.pdf?src-supplier=Newark, ComponentLink2Description=https://datasheet.octopart.com:443/GCM1555C1H102FA16D-Murata-datasheet-141265810.pdf?src-supplier=Geoflip, ComponentLink2URL=https://datasheet.octopart.com:443/GCM1555C1H102FA16D-Murata-datasheet-141265810.pdf?src-supplier=Geoflip, ComponentLink3Description=https://datasheet.octopart.com:443/GCM1555C1H102FA16D-Murata-datasheet-140655917.pdf?src-supplier=Ciiva, ComponentLink3URL=https://datasheet.octopart.com:443/GCM1555C1H102FA16D-Murata-datasheet-140655917.pdf?src-supplier=Ciiva, ComponentLink4Description=https://datasheet.octopart.com:443/GCM1555C1H102FA16D-Murata-datasheet-138715608.pdf?src-supplier=Ciiva, ComponentLink4URL=https://datasheet.octopart.com:443/GCM1555C1H102FA16D-Murata-datasheet-138715608.pdf?src-supplier=Ciiva, ComponentLink5Description=https://datasheet.octopart.com:443/GCM1555C1H102FA16D-Murata-datasheet-12511495.pdf?src-supplier=TME, ComponentLink5URL=https://datasheet.octopart.com:443/GCM1555C1H102FA16D-Murata-datasheet-12511495.pdf?src-supplier=TME, ComponentLink6Description=http://sigma.octopart.com:80/reach_statement/Murata-company-16.pdf?src-supplier=Compliance+Statements, ComponentLink6URL=http://sigma.octopart.com:80/reach_statement/Murata-company-16.pdf?src-supplier=Compliance+Statements, Export Control Classification Number (ECCN) Code=EAR99, Harmonized Tariff Schedule (HTS) Code=8532.24.00.20, Height=500µm, Introduction Date=2017-02-15, Length=1mm, Lifecycle Status=Production, Manufacturer Part Number=GCM1555C1H102FA16D, Material=Ceramic, Mount="Surface Mount", Number of Terminals=2, Pricing 1="1=0.11, 10=0.06, 50=0.0416, 100=0.036, 500=0.02644, 1000=0.02351, 2500=0.02044, 5000=0.01859 (USD)", REACH SVHC=Yes, RoHS=Compliant, Schedule B="8532240020, 8532240020|8532240020|8532240020|8532240020|8532240020", Stock 1=471842, Supplier 1=DigiKey, Thickness=500µm, Voltage Rating (DC)=50V, Width=500µm
C14 C19: library part GMC21X5R226M35NT, "35V 22uF Ceramic Capacitor, Multilayer, Ceramic, 35V, 20% +Tol, 20% -Tol, X5R, 15% TC, 22uF, Surface Mount, 0805", Capacitance=22µF, Case/Package=0805, Dielectric=X5R, Dielectric Material=Ceramic, Manufacturer="Cal-Chip Electronics", Max Operating Temperature=85°C, Min Operating Temperature=-55°C, Supplier Part Number 1=4713-GMC21X5R226M35NTTR-ND, Tolerance=±20%, Voltage Rating=35V, Category="Ceramic Capacitors", China RoHS=Compliant, ComponentLink1Description=https://datasheet.octopart.com:443/GMC21X5R226M35NT-Cal-Chip-Electronics-datasheet-182028815.pdf?src-supplier=IHS, ComponentLink1URL=https://datasheet.octopart.com:443/GMC21X5R226M35NT-Cal-Chip-Electronics-datasheet-182028815.pdf?src-supplier=IHS, Country of Origin="Slovenia, South Korea, Taiwan", Export Control Classification Number (ECCN) Code=EAR99, Harmonized Tariff Schedule (HTS) Code=8532.24.00.20, Height=1.45mm, Introduction Date=2021-04-21, Length=2mm, Lifecycle Status=Production, Manufacturer Part Number=GMC21X5R226M35NT, Material=Ceramic, Mount="Surface Mount", Number of Terminals=2, Pricing 1="2000=0.22286, 4000=0.21143, 6000=0.20571, 10000=0.19936, 14000=0.19565, 20000=0.19208 (USD)", REACH SVHC=Yes, RoHS=Compliant, Stock 1=120000, Supplier 1=DigiKey, Voltage Rating (DC)=35V, Width=1.25mm
C31 C32: library part GJM1555C1H120FB01D, "50V 12pF, 50 V, ± 1%, C0G (NP0), 0402 [1005 Metric]", Case Code (Imperial)=0402, Case Code (Metric)=1005, Dielectric=C0G, Dielectric Material=Ceramic, Manufacturer=Murata, Manufacturer Lifecycle Status="IN PRODUCTION", Max Operating Temperature=125°C, Min Operating Temperature=-55°C, Supplier Part Number 1=490-11190-1-ND, Temperature Coefficient=30ppm/°C, Tolerance=±1%, Voltage Rating=50V, Capacitance=12pF, Case/Package=0402, Category="Ceramic Capacitors", ComponentLink1Description=https://datasheet.octopart.com:443/GJM1555C1H120FB01D-Murata-datasheet-165579666.pdf?src-supplier=TME, ComponentLink1URL=https://datasheet.octopart.com:443/GJM1555C1H120FB01D-Murata-datasheet-165579666.pdf?src-supplier=TME, ComponentLink2Description=https://datasheet.octopart.com:443/GJM1555C1H120FB01D-Murata-datasheet-12511495.pdf?src-supplier=TME, ComponentLink2URL=https://datasheet.octopart.com:443/GJM1555C1H120FB01D-Murata-datasheet-12511495.pdf?src-supplier=TME, ComponentLink3Description=https://datasheet.octopart.com:443/GJM1555C1H120FB01D-Murata-datasheet-141266224.pdf?src-supplier=Ciiva, ComponentLink3URL=https://datasheet.octopart.com:443/GJM1555C1H120FB01D-Murata-datasheet-141266224.pdf?src-supplier=Ciiva, ComponentLink4Description=https://datasheet.octopart.com:443/GJM1555C1H120FB01D-Murata-datasheet-140665264.pdf?src-supplier=Ciiva, ComponentLink4URL=https://datasheet.octopart.com:443/GJM1555C1H120FB01D-Murata-datasheet-140665264.pdf?src-supplier=Ciiva, ComponentLink5Description=https://datasheet.octopart.com:443/GJM1555C1H120FB01D-Murata-datasheet-138724487.pdf?src-supplier=Ciiva, ComponentLink5URL=https://datasheet.octopart.com:443/GJM1555C1H120FB01D-Murata-datasheet-138724487.pdf?src-supplier=Ciiva, ComponentLink6Description=https://datasheet.octopart.com/GJM1555C1H120FB01D-Murata-datasheet-12515295.pdf, ComponentLink6URL=https://datasheet.octopart.com/GJM1555C1H120FB01D-Murata-datasheet-12515295.pdf, ComponentLink7Description=https://datasheet.octopart.com/GJM1555C1H120FB01D-Murata-datasheet-12510076.pdf, ComponentLink7URL=https://datasheet.octopart.com/GJM1555C1H120FB01D-Murata-datasheet-12510076.pdf, ComponentLink8Description=https://datasheet.octopart.com/GJM1555C1H120FB01D-Murata-datasheet-11978611.pdf, ComponentLink8URL=https://datasheet.octopart.com/GJM1555C1H120FB01D-Murata-datasheet-11978611.pdf, ComponentLink9Description=https://datasheet.octopart.com/GJM1555C1H120FB01D-Murata-datasheet-10025737.pdf, ComponentLink9URL=https://datasheet.octopart.com/GJM1555C1H120FB01D-Murata-datasheet-10025737.pdf, ComponentLink10Description=https://datasheet.octopart.com/GJM1555C1H120FB01D-Murata-datasheet-8819587.pdf, ComponentLink10URL=https://datasheet.octopart.com/GJM1555C1H120FB01D-Murata-datasheet-8819587.pdf, ComponentLink11Description=https://datasheet.octopart.com/GJM1555C1H120FB01D-Murata-datasheet-14407173.pdf, ComponentLink11URL=https://datasheet.octopart.com/GJM1555C1H120FB01D-Murata-datasheet-14407173.pdf, ComponentLink12Description=http://sigma.octopart.com:80/reach_statement/Murata-company-16.pdf?src-supplier=Compliance+Statements, ComponentLink12URL=http://sigma.octopart.com:80/reach_statement/Murata-company-16.pdf?src-supplier=Compliance+Statements, Depth=500µm, Export Control Classification Number (ECCN) Code=EAR99, Harmonized Tariff Schedule (HTS) Code=8532.24.00.20, Height=500µm, Introduction Date=2013-11-20, Length=1mm, Lifecycle Status=Production, Manufacturer Part Number=GJM1555C1H120FB01D, Material=Ceramic, Mount="Surface Mount", Number of Terminals=2, Pricing 1="1=0.16, 10=0.089, 50=0.0628, 100=0.0546, 500=0.04104, 1000=0.03687, 2500=0.03246, 5000=0.02982 (USD)", Radiation Hardening=No, REACH SVHC=Yes, RoHS=Compliant, Schedule B="8532240020, 8532240020|8532240020|8532240020|8532240020|8532240020", Stock 1=7555649, Supplier 1=DigiKey, Termination=SMD/SMT, Thickness=500µm, Voltage Rating (DC)=50V, Width=500µm
C33: library part GRM188R61E106KA73J, "25V 10uF X7R ±10% 0603 Multilayer Ceramic Capacitors MLCC - SMD/SMT ROHS", Capacitance=10µF, Case/Package=0603, Dielectric=X5R, Dielectric Material=Ceramic, Manufacturer=Murata, Manufacturer Lifecycle Status="IN PRODUCTION", Max Operating Temperature=85°C, Min Operating Temperature=-55°C, Supplier Part Number 1=490-GRM188R61E106KA73JCT-ND, Tolerance=±10%, Voltage Rating=25V, Category="Ceramic Capacitors", ComponentLink1Description=https://datasheet.octopart.com:443/GRM188R61E106KA73J-Murata-datasheet-165579666.pdf?src-supplier=TME, ComponentLink1URL=https://datasheet.octopart.com:443/GRM188R61E106KA73J-Murata-datasheet-165579666.pdf?src-supplier=TME, ComponentLink2Description=https://datasheet.octopart.com:443/GRM188R61E106KA73J-Murata-datasheet-141274968.pdf?src-supplier=Ciiva, ComponentLink2URL=https://datasheet.octopart.com:443/GRM188R61E106KA73J-Murata-datasheet-141274968.pdf?src-supplier=Ciiva, ComponentLink3Description=https://datasheet.octopart.com:443/GRM188R61E106KA73J-Murata-datasheet-140704821.pdf?src-supplier=Ciiva, ComponentLink3URL=https://datasheet.octopart.com:443/GRM188R61E106KA73J-Murata-datasheet-140704821.pdf?src-supplier=Ciiva, ComponentLink4Description=https://datasheet.octopart.com:443/GRM188R61E106KA73J-Murata-datasheet-138742889.pdf?src-supplier=Ciiva, ComponentLink4URL=https://datasheet.octopart.com:443/GRM188R61E106KA73J-Murata-datasheet-138742889.pdf?src-supplier=Ciiva, ComponentLink5Description=https://datasheet.octopart.com/GRM188R61E106KA73J-Murata-datasheet-12515295.pdf, ComponentLink5URL=https://datasheet.octopart.com/GRM188R61E106KA73J-Murata-datasheet-12515295.pdf, ComponentLink6Description=https://datasheet.octopart.com/GRM188R61E106KA73J-Murata-datasheet-12510076.pdf, ComponentLink6URL=https://datasheet.octopart.com/GRM188R61E106KA73J-Murata-datasheet-12510076.pdf, ComponentLink7Description=https://datasheet.octopart.com/GRM188R61E106KA73J-Murata-datasheet-11978611.pdf, ComponentLink7URL=https://datasheet.octopart.com/GRM188R61E106KA73J-Murata-datasheet-11978611.pdf, ComponentLink8Description=https://datasheet.octopart.com/GRM188R61E106KA73J-Murata-datasheet-10025737.pdf, ComponentLink8URL=https://datasheet.octopart.com/GRM188R61E106KA73J-Murata-datasheet-10025737.pdf, ComponentLink9Description=https://datasheet.octopart.com/GRM188R61E106KA73J-Murata-datasheet-8819587.pdf, ComponentLink9URL=https://datasheet.octopart.com/GRM188R61E106KA73J-Murata-datasheet-8819587.pdf, ComponentLink10Description=http://sigma.octopart.com:80/reach_statement/Murata-company-16.pdf?src-supplier=Compliance+Statements, ComponentLink10URL=http://sigma.octopart.com:80/reach_statement/Murata-company-16.pdf?src-supplier=Compliance+Statements, Height=800µm, Length=1.6mm, Lifecycle Status=Production, Manufacturer Part Number=GRM188R61E106KA73J, Material=Ceramic, Mount="Surface Mount", Number of Terminals=2, Pricing 1="1=0.26, 10=0.149, 50=0.1072, 100=0.0945, 500=0.07304, 1000=0.06643, 2500=0.05947, 5000=0.05528 (USD)", REACH SVHC=Yes, RoHS=Compliant, Stock 1=170211, Supplier 1=DigiKey, Thickness=800µm, Voltage Rating (DC)=25V, Width=800µm
C39: library part GCM155R71H103KA55D, "50V 10nF X7R ±10% 0402 Multilayer Ceramic Capacitors MLCC - SMD/SMT ROHS", Case Code (Imperial)=0402, Case Code (Metric)=1005, Dielectric=X7R, Dielectric Material=Ceramic, Manufacturer=Murata, Manufacturer Lifecycle Status="IN PRODUCTION", Max Operating Temperature=125°C, Min Operating Temperature=-55°C, Ratings=AEC-Q200, Supplier Part Number 1=490-4762-6-ND, Tolerance=±10%, Voltage=50V, Capacitance=10nF, Case/Package=0402, Category="Ceramic Capacitors", ComponentLink1Description=https://datasheet.octopart.com:443/GCM155R71H103KA55D-Murata-datasheet-149522462.pdf?src-supplier=Farnell, ComponentLink1URL=https://datasheet.octopart.com:443/GCM155R71H103KA55D-Murata-datasheet-149522462.pdf?src-supplier=Farnell, ComponentLink2Description=https://datasheet.octopart.com:443/GCM155R71H103KA55D-Murata-datasheet-39128434.pdf?src-supplier=Newark, ComponentLink2URL=https://datasheet.octopart.com:443/GCM155R71H103KA55D-Murata-datasheet-39128434.pdf?src-supplier=Newark, ComponentLink3Description=https://datasheet.octopart.com:443/GCM155R71H103KA55D-Murata-datasheet-62316942.pdf?src-supplier=element14+APAC, ComponentLink3URL=https://datasheet.octopart.com:443/GCM155R71H103KA55D-Murata-datasheet-62316942.pdf?src-supplier=element14+APAC, ComponentLink4Description=https://datasheet.octopart.com:443/GCM155R71H103KA55D-Murata-datasheet-12541648.pdf?src-supplier=_legacy+Avnet, ComponentLink4URL=https://datasheet.octopart.com:443/GCM155R71H103KA55D-Murata-datasheet-12541648.pdf?src-supplier=_legacy+Avnet, ComponentLink5Description=https://datasheet.octopart.com:443/GCM155R71H103KA55D-Murata-datasheet-14404350.pdf?src-supplier=Future+Electronics, ComponentLink5URL=https://datasheet.octopart.com:443/GCM155R71H103KA55D-Murata-datasheet-14404350.pdf?src-supplier=Future+Electronics, ComponentLink6Description=https://datasheet.octopart.com:443/GCM155R71H103KA55D-Murata-datasheet-44104302.pdf?src-supplier=Future+Electronics, ComponentLink6URL=https://datasheet.octopart.com:443/GCM155R71H103KA55D-Murata-datasheet-44104302.pdf?src-supplier=Future+Electronics, ComponentLink7Description=https://datasheet.octopart.com:443/GCM155R71H103KA55D-Murata-datasheet-141266224.pdf?src-supplier=Ciiva, ComponentLink7URL=https://datasheet.octopart.com:443/GCM155R71H103KA55D-Murata-datasheet-141266224.pdf?src-supplier=Ciiva, ComponentLink8Description=https://datasheet.octopart.com:443/GCM155R71H103KA55D-Murata-datasheet-140656749.pdf?src-supplier=Ciiva, ComponentLink8URL=https://datasheet.octopart.com:443/GCM155R71H103KA55D-Murata-datasheet-140656749.pdf?src-supplier=Ciiva, ComponentLink9Description=https://datasheet.octopart.com:443/GCM155R71H103KA55D-Murata-datasheet-138716454.pdf?src-supplier=Ciiva, ComponentLink9URL=https://datasheet.octopart.com:443/GCM155R71H103KA55D-Murata-datasheet-138716454.pdf?src-supplier=Ciiva, ComponentLink10Description=https://datasheet.octopart.com:443/GCM155R71H103KA55D-Murata-datasheet-12511495.pdf?src-supplier=TME, ComponentLink10URL=https://datasheet.octopart.com:443/GCM155R71H103KA55D-Murata-datasheet-12511495.pdf?src-supplier=TME, ComponentLink11Description=http://sigma.octopart.com:80/reach_statement/Murata-company-16.pdf?src-supplier=Compliance+Statements, ComponentLink11URL=http://sigma.octopart.com:80/reach_statement/Murata-company-16.pdf?src-supplier=Compliance+Statements, Country of Origin=Philippines, Depth=500µm, Export Control Classification Number (ECCN) Code=EAR99, Harmonized Tariff Schedule (HTS) Code=8532.24.00.20, Height=500µm, Introduction Date=2007-06-21, Lead Free="Lead Free", Length=1mm, Lifecycle Status=Production, Manufacturer Part Number=GCM155R71H103KA55D, Material=Ceramic, Mount="Surface Mount", Number of Terminals=2, Packaging="Cut Tape", Pricing 1="1=0.1, 10=0.026, 50=0.0172, 100=0.0146, 500=0.01026, 1000=0.00894, 2500=0.00756, 5000=0.00672 (USD)", Radiation Hardening=No, REACH SVHC=Yes, RoHS=Compliant, Schedule B="8532240020, 8532240020|8532240020, 8532240020|8532240020|8532240020, 8532240020|8532240020|8532240020|8532240020", Stock 1=3983526, Supplier 1=DigiKey, Termination=SMD/SMT, Voltage Rating=50V, Voltage Rating (DC)=50V, Width=500µm
CSR1 CSR2: library part RCWE0805R510FKEA, "SMD Current Sense Resistors, AEC-Q200 RCWE Series, 0.51 ohm, 250 mW, - 1%", Case Code (Imperial)=0805, Case Code (Metric)=2012, Manufacturer=Vishay, Manufacturer Package Identifier="0805 (2012 metric)", Max Operating Temperature=155°C, Max Power Dissipation=250mW, Min Operating Temperature=-55°C, Ratings=AEC-Q200, Resistance=510mΩ, Supplier Part Number 1=RCWE.51DCT-ND, Temperature Coefficient=100ppm/°C, Tolerance=±1%, Working Voltage=357.1mV, Case/Package=0805, Category="Chip SMD Resistors", China RoHS=Non-Compliant, ComponentLink1Description=https://datasheet.octopart.com:443/RCWE0805R510FKEA-Vishay-datasheet-170667730.pdf?src-supplier=IHS, ComponentLink1URL=https://datasheet.octopart.com:443/RCWE0805R510FKEA-Vishay-datasheet-170667730.pdf?src-supplier=IHS, ComponentLink2Description=https://datasheet.octopart.com:443/RCWE0805R510FKEA-Vishay-datasheet-102324946.pdf?src-supplier=Farnell, ComponentLink2URL=https://datasheet.octopart.com:443/RCWE0805R510FKEA-Vishay-datasheet-102324946.pdf?src-supplier=Farnell, ComponentLink3Description=https://datasheet.octopart.com:443/RCWE0805R510FKEA-Vishay-datasheet-78835242.pdf?src-supplier=Newark, ComponentLink3URL=https://datasheet.octopart.com:443/RCWE0805R510FKEA-Vishay-datasheet-78835242.pdf?src-supplier=Newark, ComponentLink4Description=https://datasheet.octopart.com:443/RCWE0805R510FKEA-Vishay-datasheet-10025643.pdf?src-supplier=element14+APAC, ComponentLink4URL=https://datasheet.octopart.com:443/RCWE0805R510FKEA-Vishay-datasheet-10025643.pdf?src-supplier=element14+APAC, ComponentLink5Description=https://datasheet.octopart.com:443/RCWE0805R510FKEA-Vishay-datasheet-13263558.pdf?src-supplier=Future+Electronics, ComponentLink5URL=https://datasheet.octopart.com:443/RCWE0805R510FKEA-Vishay-datasheet-13263558.pdf?src-supplier=Future+Electronics, ComponentLink6Description=https://datasheet.octopart.com:443/RCWE0805R510FKEA-Vishay-datasheet-13248156.pdf?src-supplier=Future+Electronics, ComponentLink6URL=https://datasheet.octopart.com:443/RCWE0805R510FKEA-Vishay-datasheet-13248156.pdf?src-supplier=Future+Electronics, ComponentLink7Description=https://datasheet.octopart.com:443/RCWE0805R510FKEA-Vishay-datasheet-12556293.pdf?src-supplier=Future+Electronics, ComponentLink7URL=https://datasheet.octopart.com:443/RCWE0805R510FKEA-Vishay-datasheet-12556293.pdf?src-supplier=Future+Electronics, ComponentLink8Description=https://datasheet.octopart.com:443/RCWE0805R510FKEA-Vishay-datasheet-12513971.pdf?src-supplier=Future+Electronics, ComponentLink8URL=https://datasheet.octopart.com:443/RCWE0805R510FKEA-Vishay-datasheet-12513971.pdf?src-supplier=Future+Electronics, ComponentLink9Description=http://sigma.octopart.com:80/rohs_statement/Vishay-company-15.pdf?src-supplier=Compliance+Statements, ComponentLink9URL=http://sigma.octopart.com:80/rohs_statement/Vishay-company-15.pdf?src-supplier=Compliance+Statements, Composition="Thick Film", Contact Plating=Tin, Export Control Classification Number (ECCN) Code=EAR99, Features="Automotive AEC-Q200, Moisture Resistant", Harmonized Tariff Schedule (HTS) Code=8533.21.00.30, Height=550µm, Introduction Date=2010-07-14, Length=2mm, Lifecycle Status=Production, Manufacturer Part Number=RCWE0805R510FKEA, Mount="Surface Mount", Number of Pins=2, Number of Terminals=2, Number of Terminations=2, Power Rating=250mW, Pricing 1="1=0.17, 10=0.111, 25=0.0928, 50=0.0818, 100=0.0724, 250=0.06208, 500=0.0556, 1000=0.05009 (USD)", Radiation Hardening=No, REACH SVHC=Yes, RoHS=Compliant, Schedule B="8533210045, 8533210045|8533210045|8533210045|8533210045|8533210045", Stock 1=54161, Supplier 1=DigiKey, Termination=SMD/SMT, Width=1.3mm
D1: "DO-214AC SMA SMAJ 1 Surface Mount Zener Tvs Diode 6.4V 43.5A 400W 1.05nF", Breakdown Voltage=6.7V, Capacitance=1.05nF, Clamping Voltage=9.2V, Forward Voltage=3.5V, Leakage Current=1.6mA, Manufacturer=Littelfuse, Max Breakdown Voltage=7V, Max Junction Temperature (Tj)=150°C, Max Output Current=43.5A, Max Power Dissipation=3.3W, Max Reverse Leakage Current=800µA, Min Breakdown Voltage=6.4V, Min Operating Temperature=-65°C, Operating Supply Voltage=5V, Peak Pulse Power=400W, Power Line Protection=No, Supplier Part Number 1=SMAJ5.0CALFCT-ND, Test Current=10mA, Category="TVS Diodes", China RoHS=Non-Compliant, ComponentLink1Description=https://datasheet.octopart.com:443/SMAJ5.0CA-Littelfuse-datasheet-150463581.pdf?src-supplier=IHS, ComponentLink1URL=https://datasheet.octopart.com:443/SMAJ5.0CA-Littelfuse-datasheet-150463581.pdf?src-supplier=IHS, ComponentLink2Description=https://datasheet.octopart.com:443/SMAJ5.0CA-Littelfuse-datasheet-11547152.pdf?src-supplier=element14+APAC, ComponentLink2URL=https://datasheet.octopart.com:443/SMAJ5.0CA-Littelfuse-datasheet-11547152.pdf?src-supplier=element14+APAC, ComponentLink3Description=https://datasheet.octopart.com:443/SMAJ5.0CA-Littelfuse-datasheet-5393952.pdf?src-supplier=element14+APAC, ComponentLink3URL=https://datasheet.octopart.com:443/SMAJ5.0CA-Littelfuse-datasheet-5393952.pdf?src-supplier=element14+APAC, ComponentLink4Description=https://datasheet.octopart.com:443/SMAJ5.0CA-Littelfuse-datasheet-511791.pdf?src-supplier=element14+APAC, ComponentLink4URL=https://datasheet.octopart.com:443/SMAJ5.0CA-Littelfuse-datasheet-511791.pdf?src-supplier=element14+APAC, ComponentLink5Description=https://datasheet.octopart.com:443/SMAJ5.0CA-Littelfuse-datasheet-63710798.pdf?src-supplier=Farnell, ComponentLink5URL=https://datasheet.octopart.com:443/SMAJ5.0CA-Littelfuse-datasheet-63710798.pdf?src-supplier=Farnell, ComponentLink6Description=https://datasheet.octopart.com:443/SMAJ5.0CA-Littelfuse-datasheet-165289143.pdf?src-supplier=Electro+Sonic, ComponentLink6URL=https://datasheet.octopart.com:443/SMAJ5.0CA-Littelfuse-datasheet-165289143.pdf?src-supplier=Electro+Sonic, ComponentLink7Description=https://datasheet.octopart.com:443/SMAJ5.0CA-Littelfuse-datasheet-1053.pdf?src-supplier=DigiKey, ComponentLink7URL=https://datasheet.octopart.com:443/SMAJ5.0CA-Littelfuse-datasheet-1053.pdf?src-supplier=DigiKey, ComponentLink8Description=https://datasheet.octopart.com:443/SMAJ5.0CA-Littelfuse-datasheet-164649624.pdf?src-supplier=JRH+Electronics, ComponentLink8URL=https://datasheet.octopart.com:443/SMAJ5.0CA-Littelfuse-datasheet-164649624.pdf?src-supplier=JRH+Electronics, ComponentLink9Description=https://datasheet.octopart.com:443/SMAJ5.0CA-Littelfuse-datasheet-17901671.pdf?src-supplier=Future+Electronics, ComponentLink9URL=https://datasheet.octopart.com:443/SMAJ5.0CA-Littelfuse-datasheet-17901671.pdf?src-supplier=Future+Electronics, Composition=Zener, Direction=Bidirectional, Element Configuration=Single, Height=2.29mm, Lead Free="Lead Free", Length=4.5mm, Lifecycle Status=Production, Manufacturer Part Number=SMAJ5.0CA, Max Operating Temperature=150°C, Max Surge Current=43.5A, Mount="Surface Mount", Number of Bidirectional Channels=1, Number of Channels=1, Number of Elements=1, Number of Pins=2, Number of Terminals=2, Packaging="Tape & Reel", Peak Pulse Current=43.5A, Peak Reverse Current=800µA, Polarity=Bidirectional, Power Dissipation=400W, Power Rating=400W, Pricing 1="1=0.48, 10=0.295, 100=0.1863, 500=0.13922, 1000=0.124, 2000=0.11117 (USD)", Radiation Hardening=No, REACH SVHC=No, Reverse Breakdown Voltage=6.4V, Reverse Standoff Voltage=5V, Reverse Voltage=5V, RoHS=Compliant, Schedule B="8541100080, 8541100080|8541100080|8541100080|8541100080|8541100080", Stock 1=14649, Supplier 1=DigiKey, Termination=SMD/SMT, Voltage Rating (DC)=5V, Width=2.79mm